# Allegro board 980K2-260817_261115-1_RoutingTask.brd
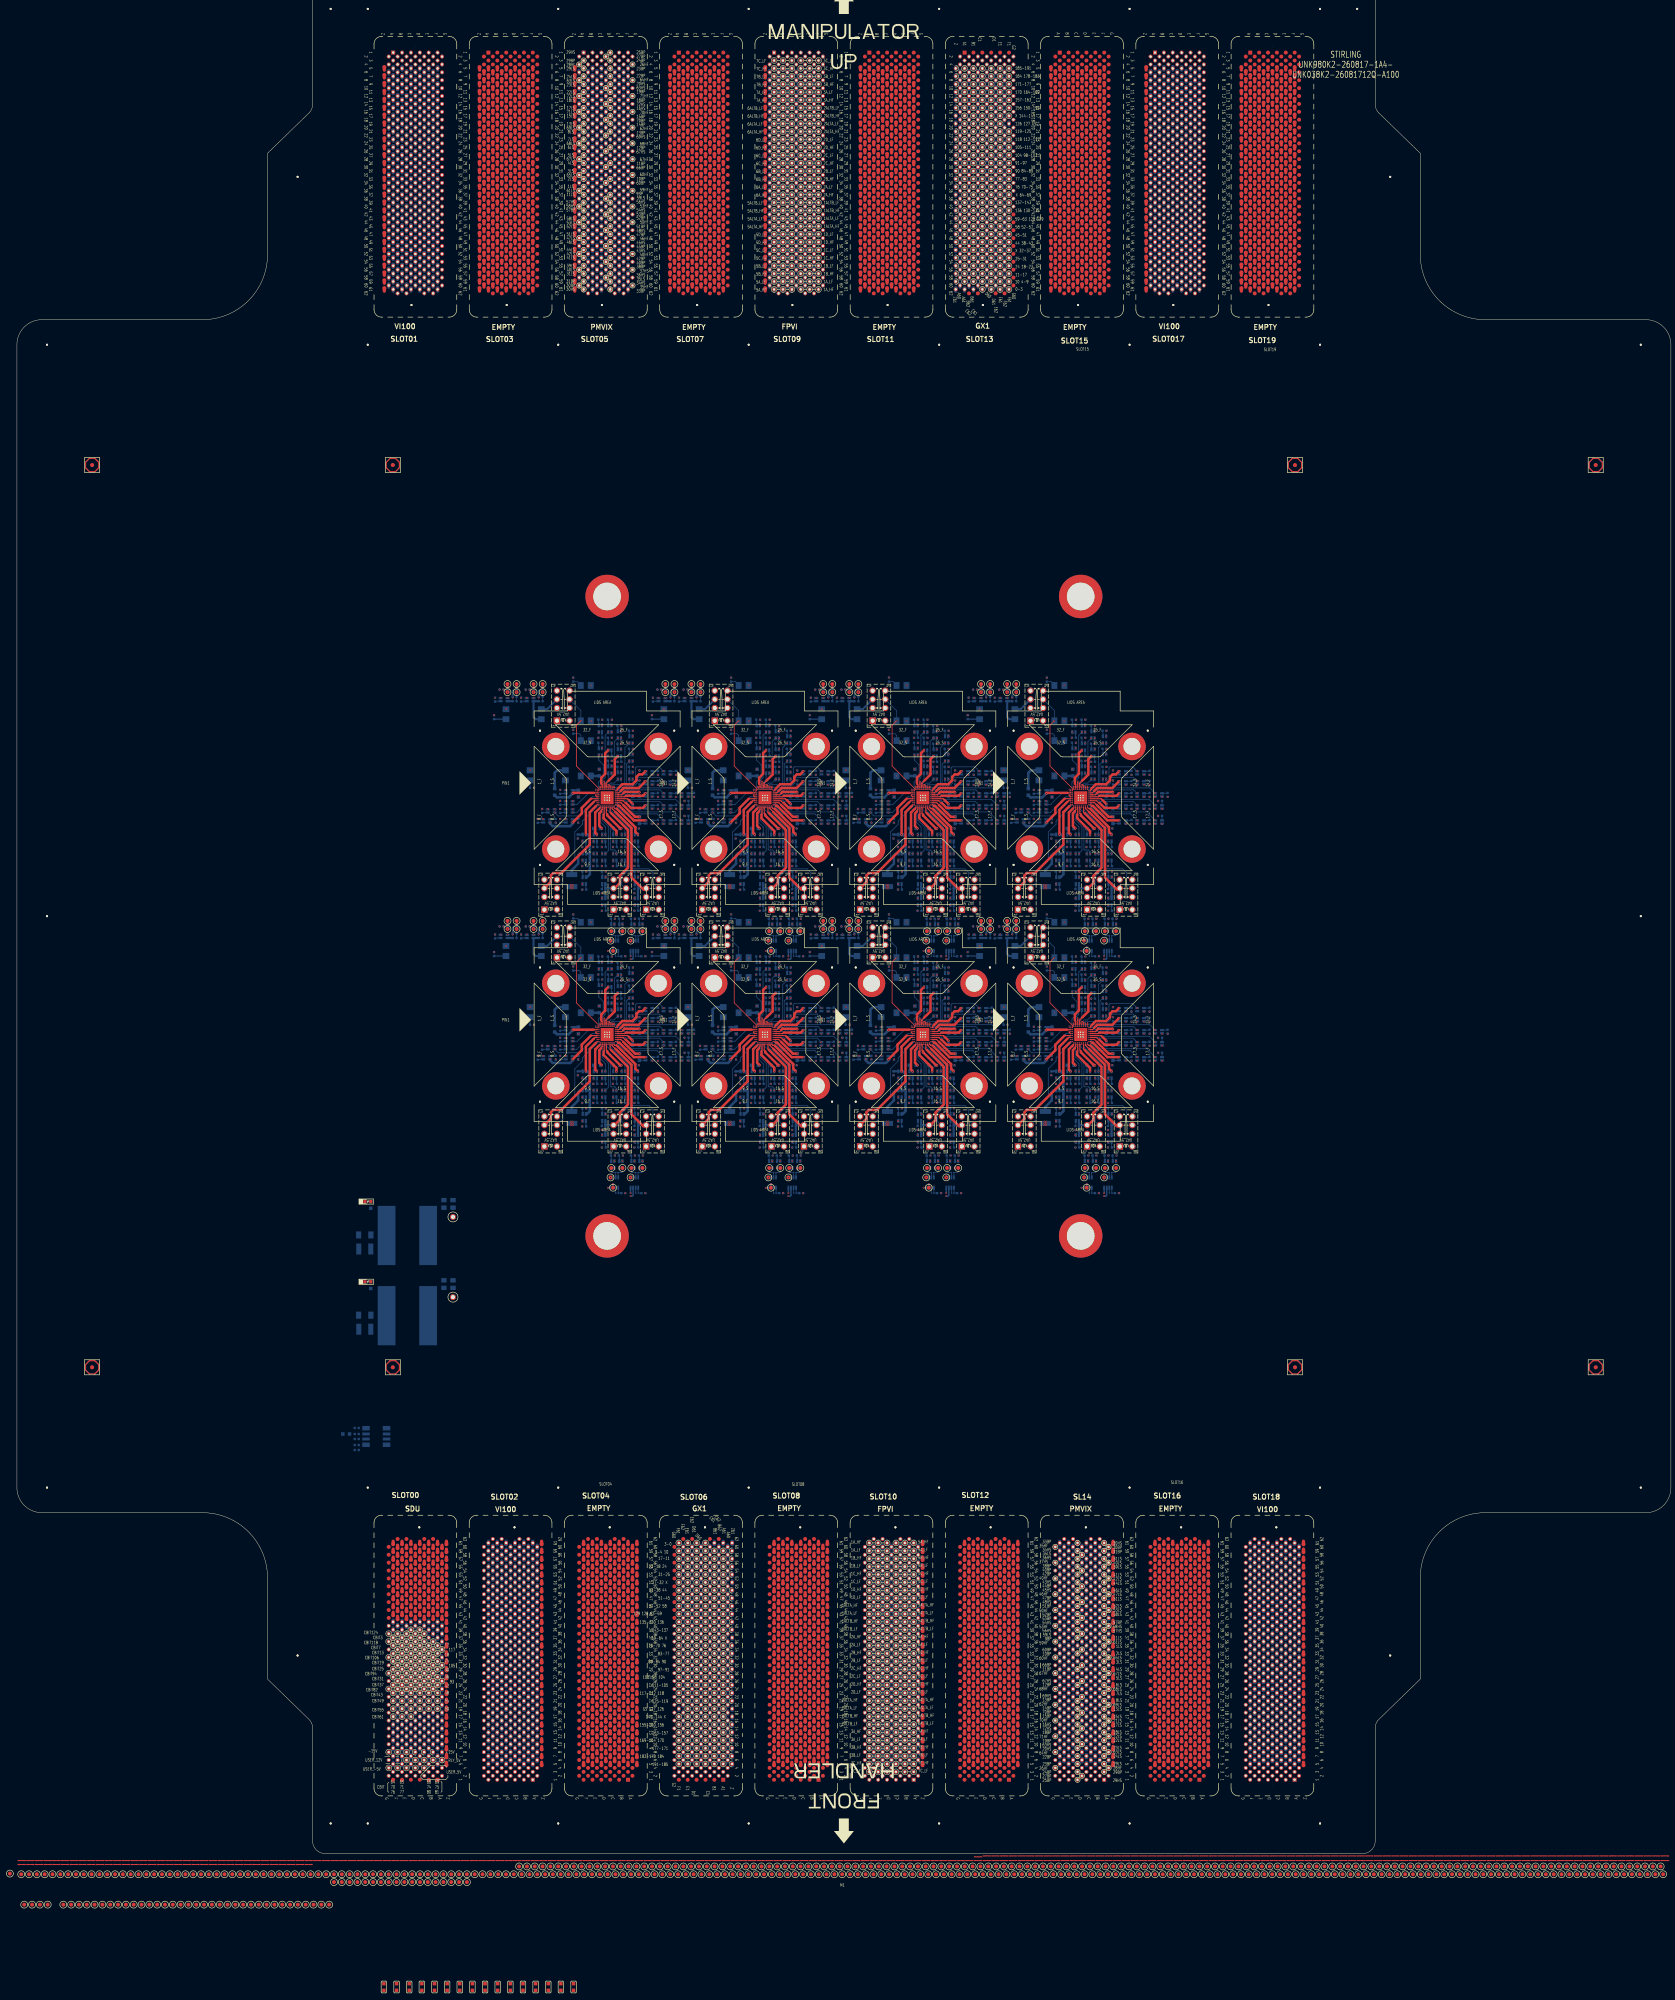
[diagram p0: board, top side]
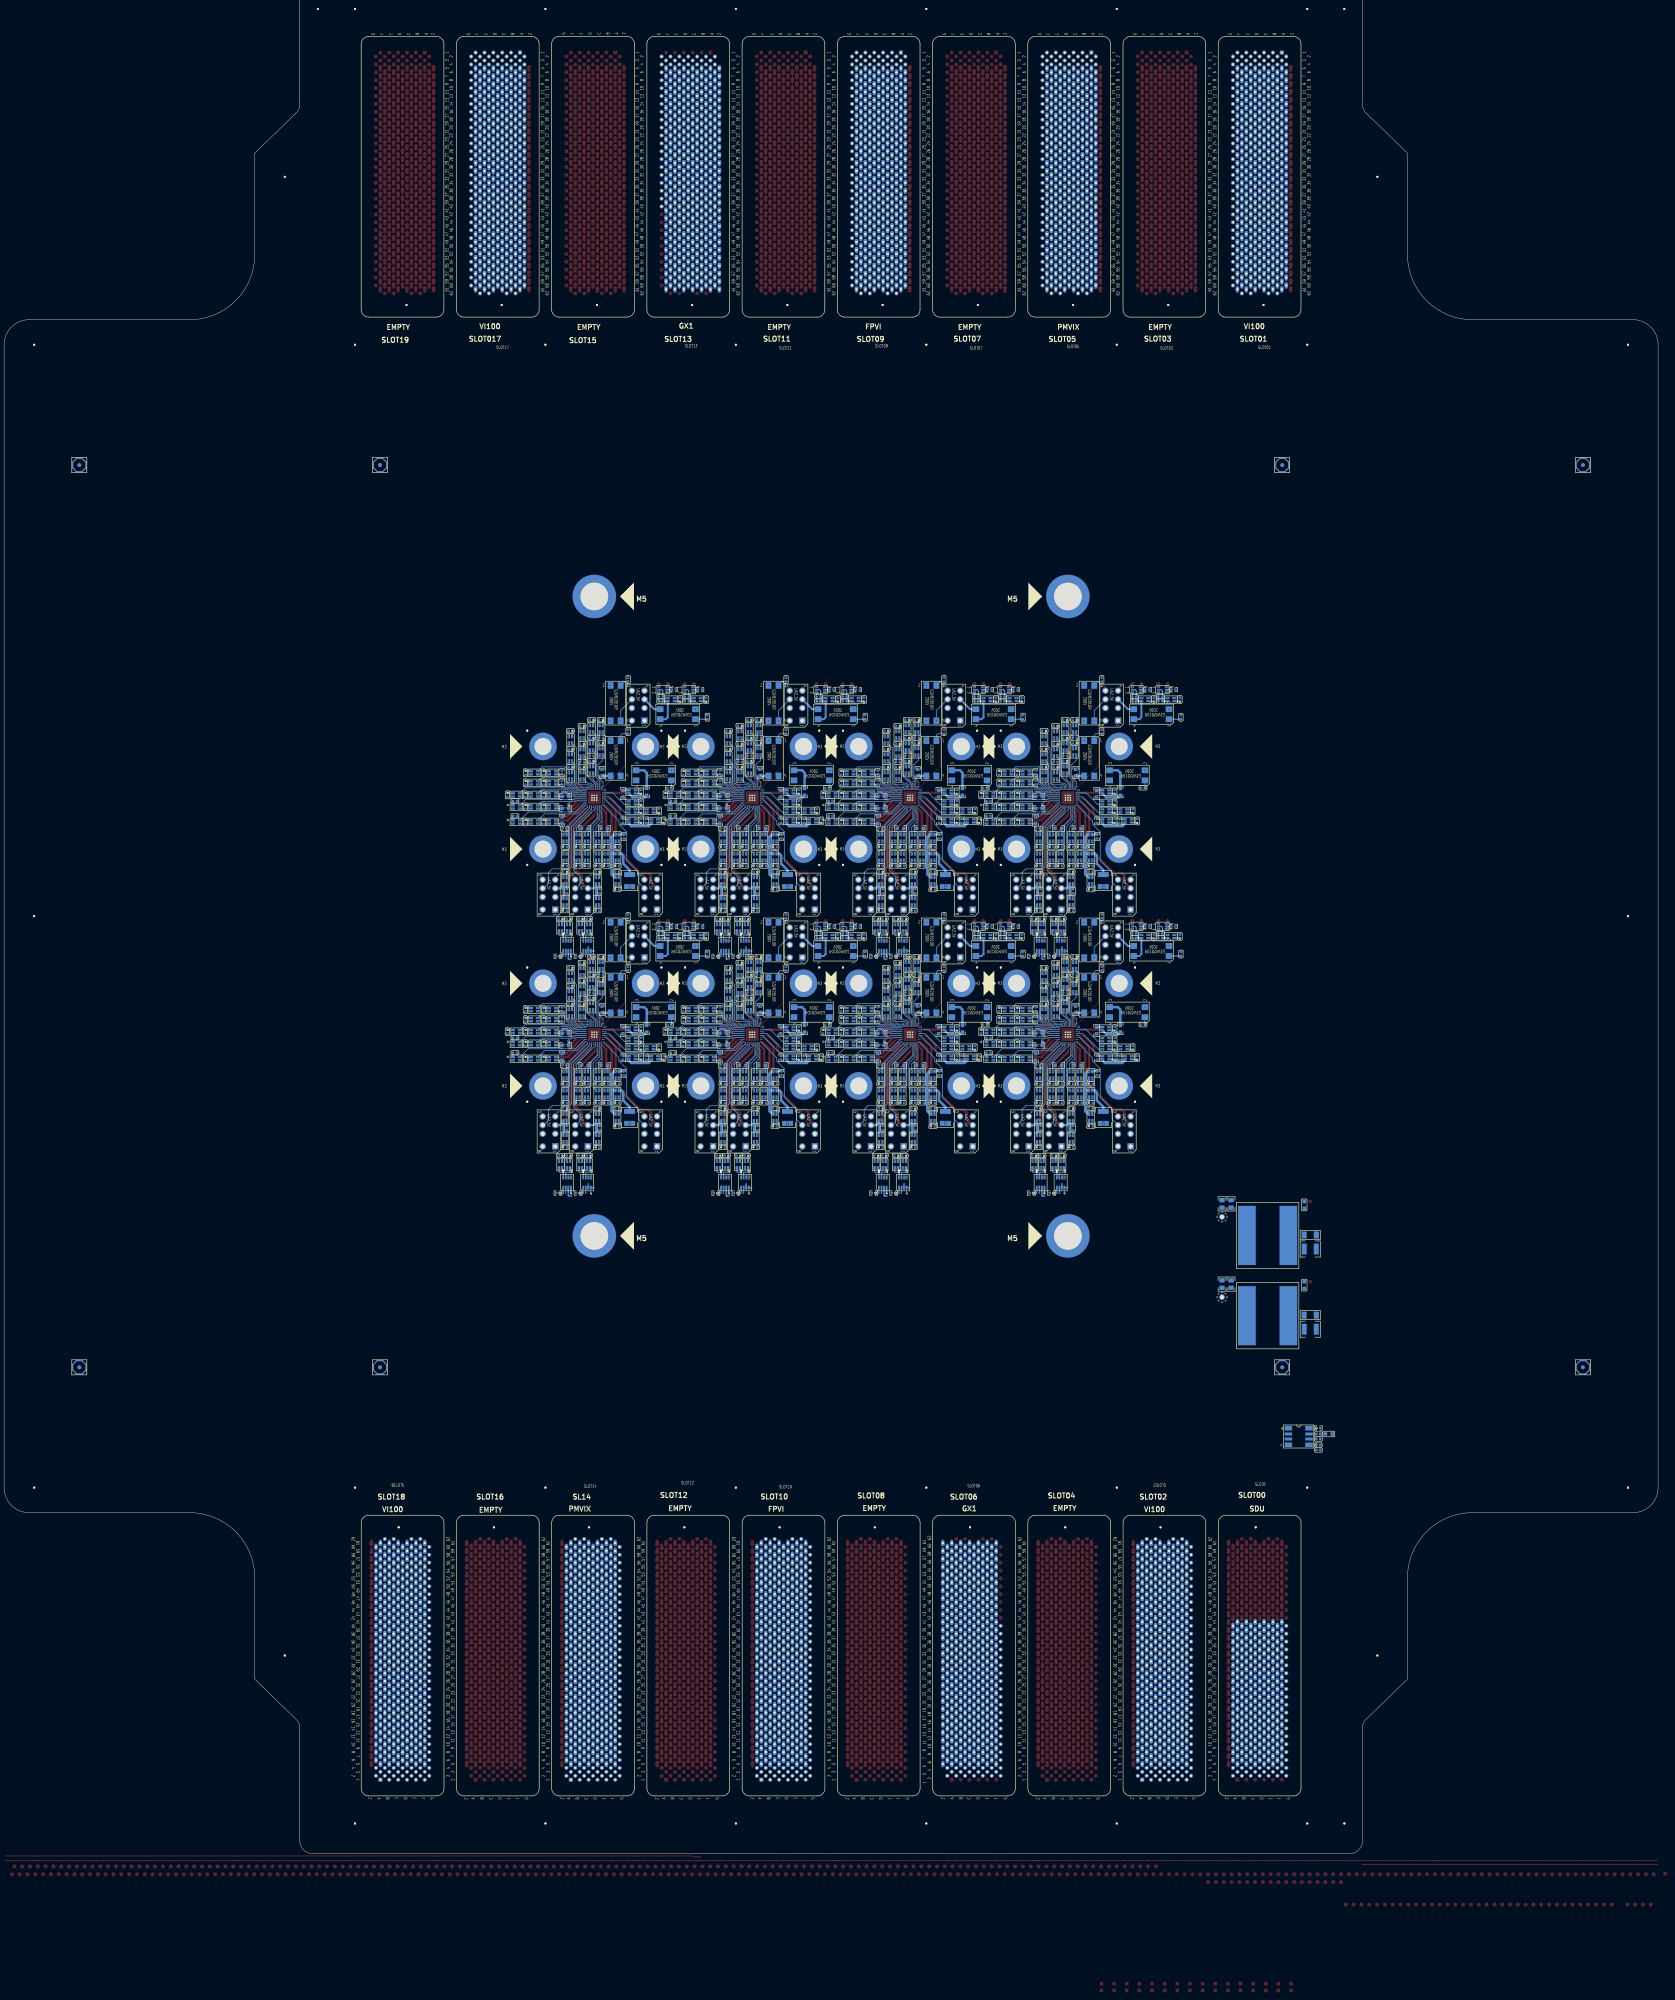
[diagram p1: board, bottom side, seen from below]

Outline 419.1 x 474.98 mm; copper layers: TOP, L02_GND, L03_DP, L04_GND, L05_DP, L06_GND, L07_VI, L08_GND, L09_VI, L10_GND, L11_VI, L12_GND, L13_VI, L14_GND, L15_5V, L16_5V, L17_C-BIT, L18_C-BIT, L19_GND, L20_VI, L21_GND, L22_VI, L23_GND, L24_VI, L25_GND, L26_VI, L27_GND, L28_DP, L29_GND, L30_DP, L31_GND, BOTTOM. Coordinates in mm from the lower left corner of the outline.

## Placement (name value [footprint] x y rotation side)
BC9  0.1U-50-X-S4-TDK  [C0402]  86.11 107.82 180 bottom
BR5  1K-1-S4  [R0402]  86.11 106.3 0 bottom
BR6  1K-1-S4  [R0402]  86.11 103.5 0 bottom
BR7  0-5-S6  [R0603]  83.44 106.3 180 bottom
BR8  0-5-S4  [R0402]  86.11 105.03 180 bottom
BR9  0-5-S4  [R0402]  86.11 102.24 180 bottom
BU1  AT24C512C-SSHM-T-SOIC8  [SO8_206X127MM]  91.06 105.66 180 bottom
C48  0.01U-100-X7R-S6-MU  [C0603]  147.57 273.87 90 bottom
C49  0.01U-100-X7R-S6-MU  [C0603]  136.27 268.99 270 bottom
C50  0.01U-100-X7R-S6-MU  [C0603]  142.28 268.54 270 bottom
C53  1U-16-X5R-S4-YA  [C0402]  142.24 261.62 270 bottom
C54  2.2U-16-X-S4-MU  [C0402]  136.53 261.62 270 bottom
C58  1U-16-X5R-S4-YA  [C0402]  142.11 257.68 270 bottom
C59  4.7U-100-X-SB-MU  [C1210]  140.59 246.51 270 bottom
C60  0.01U-100-X7R-S6-MU  [C0603]  147.01 259.72 0 bottom
C61  0.01U-100-X7R-S6-MU  [C0603]  156.88 264.78 180 bottom
C62  2.2U-16-X-S4-MU  [C0402]  157.07 259.72 0 bottom
C63  0.01U-100-X7R-S6-MU  [C0603]  157.73 261.82 90 bottom
C64  0.01U-100-X7R-S6-MU  [C0603]  156.88 267.82 180 bottom
C65  0.1U-25-X7R-S4-MU  [C0402]  157.73 271.37 90 bottom
C66  0.1U-25-X7R-S4-MU  [C0402]  152.65 276.61 180 bottom
C67  0.1U-25-X7R-S4-MU  [C0402]  150.24 278.13 180 bottom
C68  0.1U-25-X7R-S4-MU  [C0402]  147.83 282.7 180 bottom
C69  0.01U-100-X7R-S6-MU  [C0603]  151.96 259.72 0 bottom
C70  0.1U-25-X7R-S4-MU  [C0402]  122.8 294.89 180 bottom
C71  0.1U-25-X7R-S4-MU  [C0402]  129.42 294.89 180 bottom
C72  0.1U-25-X7R-S4-MU  [C0402]  158.75 227.33 0 bottom
C73  0.1U-25-X7R-S4-MU  [C0402]  153.67 227.33 0 bottom
C74  0.1U-25-X7R-S4-MU  [C0402]  157.73 273.91 90 bottom
CT1  47U-16-X5R-SB-MU  [C1210]  88.14 153.16 180 bottom
CT2  10U-16-X5R-S8-TY  [C0805]  108.2 164.59 90 bottom
CT3  22U-16-X-S8-MU  [C0805]  110.49 164.59 90 bottom
CT7  47U-16-X5R-SB-MU  [C1210]  88.14 132.84 180 bottom
CT8  10U-16-X5R-S8-TY  [C0805]  110.49 144.27 90 bottom
CT9  22U-16-X-S8-MU  [C0805]  108.2 144.27 90 bottom
F1  C1F8-0.25A-SA  [FUSE_1206_H1P05MM]  88.14 156.72 0 bottom
F2  C1F8-0.25A-SA  [FUSE_1206_H1P05MM]  88.14 136.4 0 bottom
FD1  -  [FD_040_V2]  95.25 123.19 0 top
FD2  -  [FD_040_V2]  323.85 123.19 0 top
FD3  -  [FD_040_V2]  323.85 351.79 0 top
FD4  -  [FD_040_V2]  95.25 351.79 0 top
FD5  -  [FD_040_V2]  323.85 123.19 180 bottom
FD6  -  [FD_040_V2]  95.25 123.19 180 bottom
FD7  -  [FD_040_V2]  95.25 351.79 180 bottom
FD8  -  [FD_040_V2]  323.85 351.79 180 bottom
FD9  -  [FD_040_V2]  19.05 123.19 0 top
FD10  -  [FD_040_V2]  400.05 123.19 0 top
FD11  -  [FD_040_V2]  400.05 351.79 0 top
FD12  -  [FD_040_V2]  19.05 351.79 0 top
FD13  -  [FD_040_V2]  400.05 123.19 180 bottom
FD14  -  [FD_040_V2]  19.05 123.19 180 bottom
FD15  -  [FD_040_V2]  19.05 351.79 180 bottom
FD16  -  [FD_040_V2]  400.05 351.79 180 bottom
K1  UA2-5NJ-A-V3  [RL_NECUA2_5V_V3]  138.43 290.63 270 bottom
K2  G3VM-201DR  [RL_G3VM201DR_200V]  144.15 277.5 0 bottom
K3  G3VM-201DR  [RL_G3VM201DR_200V]  134.49 273.18 90 bottom
K4  G3VM-201DR  [RL_G3VM201DR_200V]  144.15 291.47 0 bottom
K5  G3VM-51UR-5V-VSON4  [RL_G3VM_4P_VSON4]  139.95 268.99 0 bottom
K6  G3VM-51UR-5V-VSON4  [RL_G3VM_4P_VSON4]  139.95 266.19 0 bottom
K7  G3VM-51UR-5V-VSON4  [RL_G3VM_4P_VSON4]  139.95 264.16 0 bottom
K8  G3VM-51UR-5V-VSON4  [RL_G3VM_4P_VSON4]  139.95 261.62 0 bottom
K9  G3VM-51UR-5V-VSON4  [RL_G3VM_4P_VSON4]  134.24 261.62 0 bottom
K10  G3VM-51UR-5V-VSON4  [RL_G3VM_4P_VSON4]  135.38 264.16 0 bottom
K11  G3VM-51UR-5V-VSON4  [RL_G3VM_4P_VSON4]  143.76 257.3 90 bottom
K12  G3VM-51UR-5V-VSON4  [RL_G3VM_4P_VSON4]  143.76 252.48 90 bottom
K13  G3VM-51UR-5V-VSON4  [RL_G3VM_4P_VSON4]  143.76 246.51 90 bottom
K14  G3VM-51UR-5V-VSON4  [RL_G3VM_4P_VSON4]  146.56 252.48 90 bottom
K15  UA2-5NJ-A-V3  [RL_NECUA2_5V_V3]  135.25 242.75 270 bottom
K16  G3VM-51UR-5V-VSON4  [RL_G3VM_4P_VSON4]  146.56 257.3 90 bottom
K17  G3VM-51UR-5V-VSON4  [RL_G3VM_4P_VSON4]  148.72 257.3 90 bottom
K18  G3VM-51UR-5V-VSON4  [RL_G3VM_4P_VSON4]  148.72 252.48 90 bottom
K19  G3VM-51UR-5V-VSON4  [RL_G3VM_4P_VSON4]  151.51 257.3 90 bottom
K20  G3VM-51UR-5V-VSON4  [RL_G3VM_4P_VSON4]  151.51 252.48 90 bottom
K21  G3VM-51UR-5V-VSON4  [RL_G3VM_4P_VSON4]  153.67 257.3 90 bottom
K22  G3VM-51UR-5V-VSON4  [RL_G3VM_4P_VSON4]  153.67 252.48 90 bottom
K23  UA2-5NJ-A-V3  [RL_NECUA2_5V_V3]  152.78 242.75 270 bottom
K24  UA2-5NJ-A-V3  [RL_NECUA2_5V_V3]  161.04 242.75 270 bottom
K25  G3VM-51UR-5V-VSON4  [RL_G3VM_4P_VSON4]  156.97 257.3 90 bottom
K26  G3VM-51UR-5V-VSON4  [RL_G3VM_4P_VSON4]  156.97 252.48 90 bottom
K27  G3VM-51UR-5V-VSON4  [RL_G3VM_4P_VSON4]  160.15 261.37 180 bottom
K28  G3VM-51UR-5V-VSON4  [RL_G3VM_4P_VSON4]  164.72 261.37 180 bottom
K29  G3VM-51UR-5V-VSON4  [RL_G3VM_4P_VSON4]  169.29 261.37 180 bottom
K30  G3VM-51UR-5V-VSON4  [RL_G3VM_4P_VSON4]  160.15 265.18 180 bottom
K31  G3VM-51UR-5V-VSON4  [RL_G3VM_4P_VSON4]  164.72 265.18 180 bottom
K32  G3VM-51UR-5V-VSON4  [RL_G3VM_4P_VSON4]  169.29 265.18 180 bottom
K33  G3VM-51UR-5V-VSON4  [RL_G3VM_4P_VSON4]  160.15 268.22 180 bottom
K34  G3VM-51UR-5V-VSON4  [RL_G3VM_4P_VSON4]  164.72 268.22 180 bottom
K35  G3VM-51UR-5V-VSON4  [RL_G3VM_4P_VSON4]  169.29 268.22 180 bottom
K36  G3VM-51UR-5V-VSON4  [RL_G3VM_4P_VSON4]  160.15 271.27 180 bottom
K37  G3VM-51UR-5V-VSON4  [RL_G3VM_4P_VSON4]  164.72 271.27 180 bottom
K38  G3VM-51UR-5V-VSON4  [RL_G3VM_4P_VSON4]  160.15 273.81 180 bottom
K39  G3VM-51UR-5V-VSON4  [RL_G3VM_4P_VSON4]  164.72 273.81 180 bottom
K40  G3VM-51UR-5V-VSON4  [RL_G3VM_4P_VSON4]  155.58 273.05 270 bottom
K41  G3VM-51UR-5V-VSON4  [RL_G3VM_4P_VSON4]  155.58 277.62 270 bottom
K42  G3VM-51UR-5V-VSON4  [RL_G3VM_4P_VSON4]  155.58 282.19 270 bottom
K43  G3VM-51UR-5V-VSON4  [RL_G3VM_4P_VSON4]  152.65 273.05 270 bottom
K44  G3VM-51UR-5V-VSON4  [RL_G3VM_4P_VSON4]  152.65 278.89 270 bottom
K45  G3VM-51UR-5V-VSON4  [RL_G3VM_4P_VSON4]  152.65 283.46 270 bottom
K46  G3VM-51UR-5V-VSON4  [RL_G3VM_4P_VSON4]  150.24 274.57 270 bottom
K47  G3VM-51UR-5V-VSON4  [RL_G3VM_4P_VSON4]  150.24 280.42 270 bottom
K48  G3VM-51UR-5V-VSON4  [RL_G3VM_4P_VSON4]  150.24 284.99 270 bottom
K49  G3VM-51UR-5V-VSON4  [RL_G3VM_4P_VSON4]  147.83 284.99 270 bottom
K50  G3VM-51UR-5V-VSON4  [RL_G3VM_4P_VSON4]  147.83 279.15 270 bottom
K51  G3VM-51UR-5V-VSON4  [RL_G3VM_4P_VSON4]  148.72 246.51 270 bottom
K52  G3VM-51UR-5V-VSON4  [RL_G3VM_4P_VSON4]  148.72 241.17 90 bottom
K53  G3VM-51UR-5V-VSON4  [RL_G3VM_4P_VSON4]  156.97 246.51 270 bottom
K54  G3VM-51UR-5V-VSON4  [RL_G3VM_4P_VSON4]  156.97 241.17 90 bottom
K55  G3VM-51UR-5V-VSON4  [RL_G3VM_4P_VSON4]  123.44 292.35 0 bottom
K56  G3VM-201DR  [RL_G3VM201DR_200V]  128.4 288.67 90 bottom
K57  G3VM-51UR-5V-VSON4  [RL_G3VM_4P_VSON4]  158.12 234.57 270 bottom
K58  G3VM-51UR-5V-VSON4  [RL_G3VM_4P_VSON4]  156.08 234.57 270 bottom
K59  G3VM-51UR-5V-VSON4  [RL_G3VM_4P_VSON4]  153.04 234.57 270 bottom
K60  G3VM-51UR-5V-VSON4  [RL_G3VM_4P_VSON4]  151 234.57 270 bottom
K61  G3VM-51UR-5V-VSON4  [RL_G3VM_4P_VSON4]  130.05 292.35 0 bottom
LD1  LDG-2-S6  [LED_0603]  88.91 165.19 0 top
LD3  LDG-2-S6  [LED_0603]  88.91 144.87 0 top
LT1  L10U-16A-S16.5X15.5-PU  [IND_16P5X15P5MM]  98.93 156.59 0 bottom
LT3  L10U-16A-S16.5X15.5-PU  [IND_16P5X15P5MM]  98.93 136.27 0 bottom
M1  PG_LTXDX_F_X1_OUTLINE_TD_V2  [PG_LTXDX_F_X1_OUTLINE_TD_COHU]  209.55 237.49 0 top
NOREF  -  []  268.32 245.63 90 top
NOREF#2  -  []  193.6 226.96 0 top
NOREF#3  -  []  270.6 173.69 0 top
NOREF#4  -  []  156.7 193.03 90 top
NOREF#5  -  []  141.55 207.14 90 top
NOREF#6  -  []  185.41 286.99 90 top
NOREF#7  -  []  279.65 272.56 0 top
NOREF#8  -  []  233.18 244.35 0 top
NOREF#9  -  []  268.32 245.63 0 top
NOREF#10  -  []  147.8 204.99 90 top
NOREF#11  -  []  178.85 241.15 90 top
NOREF#12  -  []  235.17 221.32 0 top
NOREF#13  -  []  290.89 209.17 0 top
NOREF#14  -  []  192.25 222.59 90 top
NOREF#15  -  []  232.63 173.69 0 top
NOREF#16  -  []  214.43 232.23 0 top
NOREF#17  -  []  164.95 212.86 90 top
NOREF#18  -  []  231.11 200.17 90 top
NOREF#19  -  []  226.01 190.88 90 top
NOREF#20  -  []  144.16 191.6 90 top
NOREF#21  -  []  274.33 267.37 90 top
NOREF#22  -  []  225.61 197.6 0 top
NOREF#23  -  []  192.13 280.09 0 top
NOREF#24  -  []  243.97 200.64 90 top
NOREF#25  -  []  279.4 205.9 0 top
NOREF#26  -  []  204.95 212.86 90 top
NOREF#27  -  []  242.26 236.17 90 top
NOREF#28  -  []  163.84 205.58 0 top
NOREF#29  -  []  178.95 266.12 0 top
NOREF#30  -  []  266.01 250.88 90 top
NOREF#31  -  []  235.17 212.18 0 top
NOREF#32  -  []  142.81 247.68 0 top
NOREF#33  -  []  133.64 239.09 0 top
NOREF#34  -  []  256.63 292.23 0 top
NOREF#35  -  []  156.1 211.85 90 top
NOREF#36  -  []  170.89 269.17 0 top
NOREF#37  -  []  187.43 284.11 90 top
NOREF#38  -  []  279.4 270.55 90 top
NOREF#39  -  []  243.97 273.09 90 top
NOREF#40  -  []  273.94 196.75 0 top
NOREF#41  -  []  157.04 184.35 0 top
NOREF#42  -  []  197.71 173.69 0 top
NOREF#43  -  []  229.12 240.3 90 top
NOREF#44  -  []  217.29 187.78 0 top
NOREF#45  -  []  211.14 458.49 0 top
NOREF#46  -  []  193.56 173.37 90 top
NOREF#47  -  []  148.95 266.89 0 top
NOREF#48  -  []  204.95 267.27 90 top
NOREF#49  -  []  213.78 267.01 0 top
NOREF#50  -  []  131.26 244.35 0 top
NOREF#51  -  []  239.4 265.9 0 top
NOREF#52  -  []  202.85 297.22 0 top
NOREF#53  -  []  204.95 207.27 90 top
NOREF#54  -  []  237.04 244.35 0 top
NOREF#55  -  []  179.72 213.6 90 top
NOREF#56  -  []  228.44 181.72 90 top
NOREF#57  -  []  164.95 267.27 90 top
NOREF#58  -  []  187.3 280.35 0 top
NOREF#59  -  []  159.27 213.41 90 top
NOREF#60  -  []  284.95 270.32 90 top
NOREF#61  -  []  180.83 261.22 90 top
NOREF#62  -  []  229.84 219.54 0 top
NOREF#63  -  []  281.12 188.11 90 top
NOREF#64  -  []  217.25 236.5 90 top
NOREF#65  -  []  245.38 226.23 0 top
NOREF#66  -  []  173.64 299.09 0 top
NOREF#67  -  []  266.43 296.46 90 top
NOREF#68  -  []  243.97 213.09 90 top
NOREF#69  -  []  148.44 197.85 90 top
NOREF#70  -  []  272.63 173.69 90 top
NOREF#71  -  []  228.44 197.85 90 top
NOREF#72  -  []  101.95 82.65 0 top
NOREF#73  -  []  153.39 257.85 90 top
NOREF#74  -  []  122.57 291.95 0 top
NOREF#75  -  []  180.83 208.59 90 top
NOREF#76  -  []  192.63 173.69 90 top
NOREF#77  -  []  236.02 241.47 0 top
NOREF#78  -  []  273.76 255.7 90 top
NOREF#79  -  []  142.88 273.02 0 top
NOREF#80  -  []  283.04 176.5 90 top
NOREF#81  -  []  178.95 264.09 0 top
NOREF#82  -  []  164.61 234.24 90 top
NOREF#83  -  []  230.97 255.7 90 top
NOREF#84  -  []  221.85 292.49 0 top
NOREF#85  -  []  204.32 231.95 90 top
NOREF#86  -  []  190.97 239.57 90 top
NOREF#87  -  []  136.5 285.91 90 top
NOREF#88  -  []  187.05 209.24 0 top
NOREF#89  -  []  135.15 263.21 0 top
NOREF#90  -  []  137.28 286.47 90 top
NOREF#91  -  []  276.61 173.37 90 top
NOREF#92  -  []  221.85 232.5 0 top
NOREF#93  -  []  187 83.81 0 top
NOREF#94  -  []  155.68 233.69 90 top
NOREF#95  -  []  239.72 223.79 90 top
NOREF#96  -  []  125.25 291.4 0 top
NOREF#97  -  []  242.85 237.22 0 top
NOREF#98  -  []  283.97 204.45 90 top
NOREF#99  -  []  282.26 236.17 90 top
NOREF#100  -  []  149.24 245.31 90 top
NOREF#101  -  []  268.99 256.75 0 top
NOREF#102  -  []  235.56 175.77 0 top
NOREF#103  -  []  232.63 233.69 0 top
NOREF#104  -  []  279.27 214.21 0 top
NOREF#105  -  []  223.36 247.38 0 top
NOREF#106  -  []  163.97 274.54 0 top
NOREF#107  -  []  148.78 184.35 0 top
NOREF#108  -  []  239.27 264.78 90 top
NOREF#109  -  []  228.35 217.95 90 top
NOREF#110  -  []  161.44 244.35 0 top
NOREF#111  -  []  270.6 173.69 90 top
NOREF#112  -  []  231.11 193.35 0 top
NOREF#113  -  []  100.95 17.15 0 top
NOREF#114  -  []  231.98 280.75 90 top
NOREF#115  -  []  231.19 283.92 0 top
NOREF#116  -  []  233.56 233.37 90 top
NOREF#117  -  []  279.27 264.78 90 top
NOREF#118  -  []  237.37 256.43 90 top
NOREF#119  -  []  154.63 279.22 90 top
NOREF#120  -  []  175.11 201.22 90 top
NOREF#121  -  []  197.25 240.62 0 top
NOREF#122  -  []  286.32 266.13 0 top
NOREF#123  -  []  211.21 234.24 90 top
NOREF#124  -  []  215.59 16.49 0 top
NOREF#125  -  []  232.63 233.69 90 top
NOREF#126  -  []  230.41 228.7 90 top
NOREF#127  -  []  163.97 213.09 90 top
NOREF#128  -  []  199.27 214.21 0 top
NOREF#129  -  []  239.06 178.07 0 top
NOREF#130  -  []  196.61 233.37 90 top
NOREF#131  -  []  180.95 201.55 90 top
NOREF#132  -  []  248.42 208.62 0 top
NOREF#133  -  []  243.97 260.64 90 top
NOREF#134  -  []  143.89 185.24 90 top
NOREF#135  -  []  162.2 238.35 0 top
NOREF#136  -  []  204.61 294.89 90 top
NOREF#137  -  []  273.6 216.55 0 top
NOREF#138  -  []  146.43 236.47 90 top
NOREF#139  -  []  223.89 245.24 90 top
NOREF#140  -  []  259.08 265.79 0 top
NOREF#141  -  []  135.15 268.04 0 top
NOREF#142  -  []  267.43 278.27 0 top
NOREF#143  -  []  202.44 292.28 0 top
NOREF#144  -  []  242.2 178.35 0 top
NOREF#145  -  []  159.27 201.77 0 top
NOREF#146  -  []  174.51 203.76 0 top
NOREF#147  -  []  229.84 213.7 0 top
NOREF#148  -  []  276.57 242.05 0 top
NOREF#149  -  []  266.69 223.05 90 top
NOREF#150  -  []  254 14.59 90 top
NOREF#151  -  []  268.81 190.88 90 top
NOREF#152  -  []  148.99 251.93 0 top
NOREF#153  -  []  141.85 232.5 0 top
NOREF#154  -  []  188.44 257.85 90 top
NOREF#155  -  []  235.68 173.69 0 top
NOREF#156  -  []  196.7 253.03 90 top
NOREF#157  -  []  269.12 191.6 90 top
NOREF#158  -  []  154.63 277.85 0 top
NOREF#159  -  []  192.25 272.17 0 top
NOREF#160  -  []  276.84 227.33 0 top
NOREF#161  -  []  191.91 251.6 90 top
NOREF#162  -  []  209.52 260.42 90 top
NOREF#163  -  []  255.65 184.35 0 top
NOREF#164  -  []  269.24 245.31 90 top
NOREF#165  -  []  156.02 248.11 90 top
NOREF#166  -  []  288.42 204.78 90 top
NOREF#167  -  []  168.54 262.09 0 top
NOREF#168  -  []  137.28 286.47 0 top
NOREF#169  -  []  148.32 198.18 0 top
NOREF#170  -  []  78.11 0 90 top
NOREF#171  -  []  157.71 232.86 0 top
NOREF#172  -  []  267.9 205.84 90 top
NOREF#173  -  []  199.4 272 0 top
NOREF#174  -  []  275.51 454.29 90 top
NOREF#175  -  []  203.84 260.97 90 top
NOREF#176  -  []  143.36 253.35 0 top
NOREF#177  -  []  166.32 202.32 0 top
NOREF#178  -  []  152.25 212.18 90 top
NOREF#179  -  []  187.01 458.49 0 top
NOREF#180  -  []  146.83 256.75 0 top
NOREF#181  -  []  232.13 214.25 0 top
NOREF#182  -  []  223.36 253.35 0 top
NOREF#183  -  []  215.11 201.22 90 top
NOREF#184  -  []  241.41 167.9 90 top
NOREF#185  -  []  260.83 205.79 90 top
NOREF#186  -  []  288.42 267.82 90 top
NOREF#187  -  []  152.25 218.02 90 top
NOREF#188  -  []  184.04 196.75 0 top
NOREF#189  -  []  139.73 178.35 0 top
NOREF#190  -  []  221.55 209.94 90 top
NOREF#191  -  []  180.83 205.79 90 top
NOREF#192  -  []  164.04 237.5 90 top
NOREF#193  -  []  272.25 278.02 0 top
NOREF#194  -  []  185.41 226.99 90 top
NOREF#195  -  []  283.97 268.95 0 top
NOREF#196  -  []  153.39 253.03 90 top
NOREF#197  -  []  192.63 233.69 90 top
NOREF#198  -  []  219.73 238.35 0 top
NOREF#199  -  []  213.24 261.55 0 top
NOREF#200  -  []  262.87 273.02 0 top
NOREF#201  -  []  147.77 247.68 0 top
NOREF#202  -  []  199.22 195.7 90 top
NOREF#203  -  []  209.52 270.32 90 top
NOREF#204  -  []  138.35 204.47 0 top
NOREF#205  -  []  159.24 244.35 0 top
NOREF#206  -  []  193.03 232.1 0 top
NOREF#207  -  []  262.87 286.99 0 top
NOREF#208  -  []  150.41 228.7 90 top
NOREF#209  -  []  284.95 212.86 90 top
NOREF#210  -  []  193.76 250.88 90 top
NOREF#211  -  []  175.11 261.22 90 top
NOREF#212  -  []  95.33 18.69 0 top
NOREF#213  -  []  236.84 167.33 0 top
NOREF#214  -  []  266.16 200.17 90 top
NOREF#215  -  []  177.29 247.78 0 top
NOREF#216  -  []  89.76 164.74 90 top
NOREF#217  -  []  189.72 221.62 0 top
NOREF#218  -  []  209.55 237.49 0 top
NOREF#219  -  []  226.16 253.35 0 top
NOREF#220  -  []  220.95 206.12 90 top
NOREF#221  -  []  259.08 203.76 0 top
NOREF#222  -  []  88.14 155.19 0 top
NOREF#223  -  []  166.32 274.76 0 top
NOREF#224  -  []  140.59 244.98 90 top
NOREF#225  -  []  294.09 260.42 90 top
NOREF#226  -  []  238.11 232.1 0 top
NOREF#227  -  []  147.8 209.99 0 top
NOREF#228  -  []  233.94 251.93 0 top
NOREF#229  -  []  235.58 202.67 90 top
NOREF#230  -  []  199.27 265.58 0 top
NOREF#231  -  []  261.55 209.94 90 top
NOREF#232  -  []  182.87 226.99 0 top
NOREF#233  -  []  179.08 208.59 0 top
NOREF#234  -  []  254.43 232.23 0 top
NOREF#235  -  []  233.18 222.26 90 top
NOREF#236  -  []  271.53 233.37 90 top
NOREF#237  -  []  148.19 187.71 0 top
NOREF#238  -  []  209.52 264.23 90 top
NOREF#239  -  []  272.25 282.59 0 top
NOREF#240  -  []  273.27 258.18 0 top
NOREF#241  -  []  243.97 267.5 90 top
NOREF#242  -  []  218.83 232.23 0 top
NOREF#243  -  []  270.97 179.57 90 top
NOREF#244  -  []  119.46 18.69 90 top
NOREF#245  -  []  122.2 178.35 0 top
NOREF#246  -  []  229.72 221.62 0 top
NOREF#247  -  []  283.97 205.9 0 top
NOREF#248  -  []  281.41 227.9 90 top
NOREF#249  -  []  188.81 195.7 90 top
NOREF#250  -  []  215.65 184.35 0 top
NOREF#251  -  []  274.07 191.6 90 top
NOREF#252  -  []  211.21 294.89 90 top
NOREF#253  -  []  243.84 208.62 0 top
NOREF#254  -  []  140.83 203.76 90 top
NOREF#255  -  []  122.85 281.02 0 top
NOREF#256  -  []  197.25 180.62 0 top
NOREF#257  -  []  249.05 292.28 0 top
NOREF#258  -  []  203.84 204.78 90 top
NOREF#259  -  []  233.39 257.85 90 top
NOREF#260  -  []  192.25 278.02 90 top
NOREF#261  -  []  199.27 267.82 90 top
NOREF#262  -  []  149.67 252.5 90 top
NOREF#263  -  []  191.87 456.29 90 top
NOREF#264  -  []  199.27 205.58 0 top
NOREF#265  -  []  270.15 266.89 90 top
NOREF#266  -  []  209.55 237.49 0 top
NOREF#267  -  []  276.1 280.99 90 top
NOREF#268  -  []  264.16 251.6 90 top
NOREF#269  -  []  203.84 210.87 90 top
NOREF#270  -  []  229.84 279.54 0 top
NOREF#271  -  []  152.66 226.35 90 top
NOREF#272  -  []  133.36 201.22 0 top
NOREF#273  -  []  214.09 264.23 90 top
NOREF#274  -  []  194.39 226.59 90 top
NOREF#275  -  []  89.74 155.92 90 top
NOREF#276  -  []  227.3 286.19 0 top
NOREF#277  -  []  239.27 267.82 90 top
NOREF#278  -  []  207.04 299.09 0 top
NOREF#279  -  []  143.36 258.18 0 top
NOREF#280  -  []  302.59 389.27 90 top
NOREF#281  -  []  267.43 224.11 90 top
NOREF#282  -  []  226.16 212.17 90 top
NOREF#283  -  []  228.78 244.35 0 top
NOREF#284  -  []  209.17 291.95 0 top
NOREF#285  -  []  208.42 264.78 90 top
NOREF#286  -  []  149.84 219.54 0 top
NOREF#287  -  []  138.75 457.2 0 top
NOREF#288  -  []  269.72 281.62 0 top
NOREF#289  -  []  164.95 272.86 90 top
NOREF#290  -  []  199.4 212 0 top
NOREF#291  -  []  283.84 260.97 90 top
NOREF#292  -  []  186.16 226.14 90 top
NOREF#293  -  []  199.72 279.22 90 top
NOREF#294  -  []  159.27 268.62 0 top
NOREF#295  -  []  159.4 268.95 0 top
NOREF#296  -  []  211.25 244.35 0 top
NOREF#297  -  []  163.84 267.82 90 top
NOREF#298  -  []  196.5 392.33 90 top
NOREF#299  -  []  151.24 257.85 90 top
NOREF#300  -  []  284.95 200.42 90 top
NOREF#301  -  []  188.32 253.35 0 top
NOREF#302  -  []  125.38 226.23 0 top
NOREF#303  -  []  254.09 200.42 90 top
NOREF#304  -  []  218.35 271.84 0 top
NOREF#305  -  []  165.49 452.29 90 top
NOREF#306  -  []  243.84 264.78 90 top
NOREF#307  -  []  267.8 269.99 0 top
NOREF#308  -  []  279.22 239.57 90 top
NOREF#309  -  []  236.7 197.85 90 top
NOREF#310  -  []  148.32 193.35 0 top
NOREF#311  -  []  254.33 389.27 90 top
NOREF#312  -  []  224.16 256.43 90 top
NOREF#313  -  []  148.81 195.7 90 top
NOREF#314  -  []  195.68 233.69 90 top
NOREF#315  -  []  260.83 203.76 90 top
NOREF#316  -  []  219.72 273.6 90 top
NOREF#317  -  []  154.63 282.42 0 top
NOREF#318  -  []  273.94 191.93 0 top
NOREF#319  -  []  146.7 223.05 90 top
NOREF#320  -  []  223.49 197.85 90 top
NOREF#321  -  []  149.55 248.99 90 top
NOREF#322  -  []  248.54 262.09 0 top
NOREF#323  -  []  228.35 223.79 90 top
NOREF#324  -  []  218.95 268.91 0 top
NOREF#325  -  []  203.84 200.97 90 top
NOREF#326  -  []  274.07 251.6 90 top
NOREF#327  -  []  187.43 224.11 0 top
NOREF#328  -  []  148.44 241.72 90 top
NOREF#329  -  []  188.32 193.35 0 top
NOREF#330  -  []  254.09 204.23 90 top
NOREF#331  -  []  239.27 201.77 0 top
NOREF#332  -  []  194.39 286.59 90 top
NOREF#333  -  []  203.97 260.64 90 top
NOREF#334  -  []  302.26 14.59 90 top
NOREF#335  -  []  276.52 225.69 0 top
NOREF#336  -  []  235.49 228.7 90 top
NOREF#337  -  []  267.3 226.19 0 top
NOREF#338  -  []  146.88 283.95 0 top
NOREF#339  -  []  229.12 196.43 90 top
NOREF#340  -  []  227.43 218.27 0 top
NOREF#341  -  []  194.39 222.02 90 top
NOREF#342  -  []  258.95 201.55 0 top
NOREF#343  -  []  195.17 276.75 90 top
NOREF#344  -  []  189.84 224.11 90 top
NOREF#345  -  []  189.55 188.99 90 top
NOREF#346  -  []  269.84 224.11 0 top
NOREF#347  -  []  281.75 209.17 0 top
NOREF#348  -  []  261.85 246.47 0 top
NOREF#349  -  []  146.83 196.75 0 top
NOREF#350  -  []  275.58 262.67 90 top
NOREF#351  -  []  263.49 197.85 90 top
NOREF#352  -  []  237.59 175.77 0 top
NOREF#353  -  []  194.07 256.43 90 top
NOREF#354  -  []  236.02 192.78 0 top
NOREF#355  -  []  192.63 172.86 0 top
NOREF#356  -  []  199.4 274.54 0 top
NOREF#357  -  []  239.4 200.64 90 top
NOREF#358  -  []  168.54 260.64 90 top
NOREF#359  -  []  253.62 289.09 90 top
NOREF#360  -  []  184.16 196.43 90 top
NOREF#361  -  []  156.1 271.85 90 top
NOREF#362  -  []  236.8 214.65 90 top
NOREF#363  -  []  237.37 191.6 90 top
NOREF#364  -  []  195.96 168.6 90 top
NOREF#365  -  []  284.64 181.15 90 top
NOREF#366  -  []  186.96 191.6 90 top
NOREF#367  -  []  211.65 293.3 90 top
NOREF#368  -  []  166.32 266.13 0 top
NOREF#369  -  []  239.4 213.09 90 top
NOREF#370  -  []  233.27 253.35 0 top
NOREF#371  -  []  211.25 184.35 0 top
NOREF#372  -  []  191.95 238.07 0 top
NOREF#373  -  []  185.09 257.49 90 top
NOREF#374  -  []  271.53 173.37 90 top
NOREF#375  -  []  190.97 255.7 90 top
NOREF#376  -  []  228.99 196.75 0 top
NOREF#377  -  []  279.72 223.79 90 top
NOREF#378  -  []  272.25 272.17 0 top
NOREF#379  -  []  208.94 221.73 0 top
NOREF#380  -  []  155.05 218.82 0 top
NOREF#381  -  []  138.56 246.51 0 top
NOREF#382  -  []  146.88 289.79 0 top
NOREF#383  -  []  236.52 216.55 0 top
NOREF#384  -  []  267.77 252.78 0 top
NOREF#385  -  []  154.62 247.68 90 top
NOREF#386  -  []  276.02 241.47 0 top
NOREF#387  -  []  196.7 197.85 90 top
NOREF#388  -  []  274.33 204.33 90 top
NOREF#389  -  []  258.95 264.09 0 top
NOREF#390  -  []  144.71 247.68 90 top
NOREF#391  -  []  138.35 209.04 0 top
NOREF#392  -  []  264.04 185.96 0 top
NOREF#393  -  []  244.64 181.15 90 top
NOREF#394  -  []  246.32 212.22 0 top
NOREF#395  -  []  183.49 247.06 90 top
NOREF#396  -  []  242.2 238.35 0 top
NOREF#397  -  []  168.54 202.09 0 top
NOREF#398  -  []  201.75 266.13 0 top
NOREF#399  -  []  130.92 231.95 90 top
NOREF#400  -  []  208.42 268.62 0 top
NOREF#401  -  []  177.25 236.5 90 top
NOREF#402  -  []  286.32 206.13 0 top
NOREF#403  -  []  242.2 238.35 0 top
NOREF#404  -  []  157.92 236.37 90 top
NOREF#405  -  []  260.83 208.59 90 top
NOREF#406  -  []  152.87 188.11 90 top
NOREF#407  -  []  216.55 194.49 90 top
NOREF#408  -  []  258.35 271.84 0 top
NOREF#409  -  []  248.54 204.45 90 top
NOREF#410  -  []  196.1 211.85 90 top
NOREF#411  -  []  266.96 191.6 90 top
NOREF#412  -  []  106.83 127.87 90 top
NOREF#413  -  []  241.75 269.17 0 top
NOREF#414  -  []  243.97 205.9 0 top
NOREF#415  -  []  237.92 190.01 0 top
NOREF#416  -  []  273.03 232.1 0 top
NOREF#417  -  []  272.72 257.6 0 top
NOREF#418  -  []  232.13 274.25 0 top
NOREF#419  -  []  279.4 208.95 0 top
NOREF#420  -  []  186.28 253.03 90 top
NOREF#421  -  []  152.25 218.02 0 top
NOREF#422  -  []  171.05 245.49 90 top
NOREF#423  -  []  268.99 196.75 0 top
NOREF#424  -  []  249.52 210.32 90 top
NOREF#425  -  []  235.92 190.88 90 top
NOREF#426  -  []  155.17 281.32 0 top
NOREF#427  -  []  191.11 193.35 0 top
NOREF#428  -  []  293.99 17.15 0 top
NOREF#429  -  []  208.54 268.95 0 top
NOREF#430  -  []  192.25 272.17 90 top
NOREF#431  -  []  254.38 204.09 0 top
NOREF#432  -  []  219.73 178.35 0 top
NOREF#433  -  []  191.53 173.37 90 top
NOREF#434  -  []  288.54 260.64 90 top
NOREF#435  -  []  171.05 185.49 90 top
NOREF#436  -  []  236.45 247.71 0 top
NOREF#437  -  []  211.21 294.24 90 top
NOREF#438  -  []  233.56 173.37 90 top
NOREF#439  -  []  235.92 255.7 90 top
NOREF#440  -  []  162.26 236.17 90 top
NOREF#441  -  []  220.83 203.76 90 top
NOREF#442  -  []  239.24 184.35 0 top
NOREF#443  -  []  199.27 268.62 0 top
NOREF#444  -  []  192.13 220.09 0 top
NOREF#445  -  []  212.55 224.49 0 top
NOREF#446  -  []  237.25 240.62 0 top
NOREF#447  -  []  195.17 221.32 90 top
NOREF#448  -  []  214.04 210.63 90 top
NOREF#449  -  []  123.4 236.38 0 top
NOREF#450  -  []  244.95 207.27 90 top
NOREF#451  -  []  227.3 226.19 0 top
NOREF#452  -  []  145.09 257.49 90 top
NOREF#453  -  []  148.19 247.71 0 top
NOREF#454  -  []  201.12 188.11 90 top
NOREF#455  -  []  227.77 197.6 0 top
NOREF#456  -  []  159.4 273.09 90 top
NOREF#457  -  []  148.44 181.72 90 top
NOREF#458  -  []  152.72 247.68 0 top
NOREF#459  -  []  109.55 389.27 90 top
NOREF#460  -  []  265.42 274.72 90 top
NOREF#461  -  []  217.25 176.5 90 top
NOREF#462  -  []  199.27 204.78 90 top
NOREF#463  -  []  222.87 226.99 0 top
NOREF#464  -  []  147.99 178.35 0 top
NOREF#465  -  []  246.32 274.76 0 top
NOREF#466  -  []  190.98 244.35 0 top
NOREF#467  -  []  219.08 265.79 0 top
NOREF#468  -  []  188.32 245.63 90 top
NOREF#469  -  []  284.95 260.42 90 top
NOREF#470  -  []  151.19 228.49 0 top
NOREF#471  -  []  140.95 208.91 90 top
NOREF#472  -  []  288.42 268.62 0 top
NOREF#473  -  []  149.29 285.22 0 top
NOREF#474  -  []  193.76 255.7 90 top
NOREF#475  -  []  220.95 204.09 90 top
NOREF#476  -  []  262.87 226.99 0 top
NOREF#477  -  []  218.35 209.04 0 top
NOREF#478  -  []  95.35 456.29 0 top
NOREF#479  -  []  194.78 236.5 90 top
NOREF#480  -  []  211.05 245.49 90 top
NOREF#481  -  []  153.98 178.07 0 top
NOREF#482  -  []  230.88 168.6 90 top
NOREF#483  -  []  283.97 213.09 90 top
NOREF#484  -  []  271.73 232.54 0 top
NOREF#485  -  []  266.69 297.01 90 top
NOREF#486  -  []  192.51 235.77 0 top
NOREF#487  -  []  163.84 200.97 90 top
NOREF#488  -  []  225.41 213.02 90 top
NOREF#489  -  []  243.84 267.82 90 top
NOREF#490  -  []  196.7 193.03 90 top
NOREF#491  -  []  232.25 218.02 0 top
NOREF#492  -  []  190.56 252.78 0 top
NOREF#493  -  []  264.16 196.43 90 top
NOREF#494  -  []  186.7 297.01 90 top
NOREF#495  -  []  199.27 271.67 0 top
NOREF#496  -  []  156.02 197.6 0 top
NOREF#497  -  []  260.43 224.38 90 top
NOREF#498  -  []  214.09 204.23 90 top
NOREF#499  -  []  203.84 211.67 0 top
NOREF#500  -  []  267.3 220.35 0 top
NOREF#501  -  []  175.02 268.14 90 top
NOREF#502  -  []  249.52 270.32 90 top
NOREF#503  -  []  261.85 232.5 0 top
NOREF#504  -  []  195.56 235.77 0 top
NOREF#505  -  []  256.55 254.49 90 top
NOREF#506  -  []  228.44 253.03 90 top
NOREF#507  -  []  156.1 216.42 90 top
NOREF#508  -  []  294.09 200.42 90 top
NOREF#509  -  []  284.95 210.32 90 top
NOREF#510  -  []  153.6 222.39 0 top
NOREF#511  -  []  169.52 204.23 90 top
NOREF#512  -  []  279.4 210.55 90 top
NOREF#513  -  []  168.42 268.62 0 top
NOREF#514  -  []  261.55 207.14 90 top
NOREF#515  -  []  196.7 181.72 90 top
NOREF#516  -  []  147.43 284.11 0 top
NOREF#517  -  []  230.77 213.37 90 top
NOREF#518  -  []  265.41 286.99 90 top
NOREF#519  -  []  135.15 260.67 90 top
NOREF#520  -  []  159.4 274.54 0 top
NOREF#521  -  []  142.88 226.99 0 top
NOREF#522  -  []  191.19 218.07 0 top
NOREF#523  -  []  236.1 276.42 90 top
NOREF#524  -  []  256.55 194.49 90 top
NOREF#525  -  []  227.05 269.24 0 top
NOREF#526  -  []  133.24 201.55 0 top
NOREF#527  -  []  196.52 281.12 0 top
NOREF#528  -  []  248.54 202.09 0 top
NOREF#529  -  []  277.5 185.31 90 top
NOREF#530  -  []  215.24 201.55 90 top
NOREF#531  -  []  271.91 196.43 90 top
NOREF#532  -  []  94.87 102.74 90 top
NOREF#533  -  []  196.57 245.63 0 top
NOREF#534  -  []  228.44 193.03 90 top
NOREF#535  -  []  236.84 227.33 0 top
NOREF#536  -  []  134.38 264.09 0 top
NOREF#537  -  []  130.02 274.45 0 top
NOREF#538  -  []  129.49 266.31 0 top
NOREF#539  -  []  231.24 193.03 90 top
NOREF#540  -  []  203.97 204.45 90 top
NOREF#541  -  []  174.07 270.89 90 top
NOREF#542  -  []  196.57 242.05 0 top
NOREF#543  -  []  277.37 196.43 90 top
NOREF#544  -  []  147.43 224.11 90 top
NOREF#545  -  []  231.73 172.54 0 top
NOREF#546  -  []  187.8 269.99 0 top
NOREF#547  -  []  153.76 195.7 90 top
NOREF#548  -  []  275.17 281.32 90 top
NOREF#549  -  []  239.27 207.82 90 top
NOREF#550  -  []  197.59 175.77 0 top
NOREF#551  -  []  139.08 208.59 0 top
NOREF#552  -  []  189.84 273.7 90 top
NOREF#553  -  []  209.55 237.49 0 top
NOREF#554  -  []  190.56 197.6 0 top
NOREF#555  -  []  14.6 372.12 0 top
NOREF#556  -  []  223.89 185.24 90 top
NOREF#557  -  []  270.6 233.69 90 top
NOREF#558  -  []  268.35 277.95 90 top
NOREF#559  -  []  235.15 176.17 90 top
NOREF#560  -  []  234.33 267.37 90 top
NOREF#561  -  []  264.26 456.29 90 top
NOREF#562  -  []  163.97 272 0 top
NOREF#563  -  []  203.97 200.64 90 top
NOREF#564  -  []  151.24 197.85 90 top
NOREF#565  -  []  155.17 216.75 0 top
NOREF#566  -  []  231.98 286.59 90 top
NOREF#567  -  []  267.8 209.99 0 top
NOREF#568  -  []  243.97 210.55 90 top
NOREF#569  -  []  197.5 185.31 90 top
NOREF#570  -  []  185.42 274.72 90 top
NOREF#571  -  []  197.47 17.15 90 top
NOREF#572  -  []  280.23 176.17 90 top
NOREF#573  -  []  193.95 256.75 0 top
NOREF#574  -  []  188.78 184.35 0 top
NOREF#575  -  []  151.79 191.93 0 top
NOREF#576  -  []  272.25 218.02 0 top
NOREF#577  -  []  178.35 207.01 0 top
NOREF#578  -  []  197.25 191.93 0 top
NOREF#579  -  []  153.27 193.35 0 top
NOREF#580  -  []  270.48 175.77 0 top
NOREF#581  -  []  198.64 233.37 90 top
NOREF#582  -  []  146.16 193.35 0 top
NOREF#583  -  []  273.94 251.93 0 top
NOREF#584  -  []  167.04 299.09 0 top
NOREF#585  -  []  276.02 252.78 0 top
NOREF#586  -  []  190.77 279.22 90 top
NOREF#587  -  []  219.55 240.49 90 top
NOREF#588  -  []  266.16 258.18 0 top
NOREF#589  -  []  173.24 201.55 0 top
NOREF#590  -  []  130.02 214.45 0 top
NOREF#591  -  []  219.55 234.49 0 top
NOREF#592  -  []  197.71 172.86 0 top
NOREF#593  -  []  193.18 282.26 90 top
NOREF#594  -  []  189.12 256.43 90 top
NOREF#595  -  []  276.45 187.71 0 top
NOREF#596  -  []  196.02 257.6 0 top
NOREF#597  -  []  283.97 200.64 90 top
NOREF#598  -  []  198.91 172.21 90 top
NOREF#599  -  []  245.38 286.23 0 top
NOREF#600  -  []  259.73 238.35 0 top
NOREF#601  -  []  165.38 226.23 0 top
NOREF#602  -  []  277.25 196.75 0 top
NOREF#603  -  []  281.44 244.35 0 top
NOREF#604  -  []  165.04 293.3 90 top
NOREF#605  -  []  248.42 264.78 90 top
NOREF#606  -  []  245.04 293.3 90 top
NOREF#607  -  []  146.83 191.93 0 top
NOREF#608  -  []  125.08 17.15 0 top
NOREF#609  -  []  147.9 205.84 90 top
NOREF#610  -  []  162.26 176.17 90 top
NOREF#611  -  []  202.57 291.95 0 top
NOREF#612  -  []  222.81 192.78 0 top
NOREF#613  -  []  279.4 265.9 0 top
NOREF#614  -  []  127.98 226.38 90 top
NOREF#615  -  []  283.84 200.97 90 top
NOREF#616  -  []  152.72 192.78 0 top
NOREF#617  -  []  142.88 213.02 0 top
NOREF#618  -  []  203.84 267.82 90 top
NOREF#619  -  []  242.44 232.28 0 top
NOREF#620  -  []  176.55 280.49 0 top
NOREF#621  -  []  268.35 283.79 90 top
NOREF#622  -  []  281.75 202.32 0 top
NOREF#623  -  []  232.66 166.36 90 top
NOREF#624  -  []  239.72 219.22 90 top
NOREF#625  -  []  258.95 208.91 0 top
NOREF#626  -  []  163.97 200.64 90 top
NOREF#627  -  []  186.43 236.47 90 top
NOREF#628  -  []  196.02 252.78 0 top
NOREF#629  -  []  196.7 257.85 90 top
NOREF#630  -  []  246.32 206.13 0 top
NOREF#631  -  []  0 382.27 0 top
NOREF#632  -  []  203.84 201.77 0 top
NOREF#633  -  []  254.09 264.23 90 top
NOREF#634  -  []  258.35 204.47 0 top
NOREF#635  -  []  324.88 21.69 90 top
NOREF#636  -  []  260.95 201.55 90 top
NOREF#637  -  []  228.81 250.88 90 top
NOREF#638  -  []  250.02 274.45 0 top
NOREF#639  -  []  227.43 278.27 90 top
NOREF#640  -  []  180.83 263.76 90 top
NOREF#641  -  []  206.32 269.17 0 top
NOREF#642  -  []  253.36 201.22 0 top
NOREF#643  -  []  195.92 195.7 90 top
NOREF#644  -  []  147.8 269.99 0 top
NOREF#645  -  []  155.05 214.25 0 top
NOREF#646  -  []  133.24 261.55 0 top
NOREF#647  -  []  257.29 187.78 0 top
NOREF#648  -  []  232.25 282.59 90 top
NOREF#649  -  []  276.7 181.72 90 top
NOREF#650  -  []  189.84 284.11 0 top
NOREF#651  -  []  187.43 218.27 90 top
NOREF#652  -  []  150.97 195.7 90 top
NOREF#653  -  []  275.17 221.32 90 top
NOREF#654  -  []  181.6 294.14 0 top
NOREF#655  -  []  183.89 185.24 90 top
NOREF#656  -  []  205.38 226.23 0 top
NOREF#657  -  []  265.61 192.78 0 top
NOREF#658  -  []  231.18 239.15 0 top
NOREF#659  -  []  196.84 227.33 0 top
NOREF#660  -  []  143.36 193.35 0 top
NOREF#661  -  []  266.69 237.02 90 top
NOREF#662  -  []  230.97 239.57 90 top
NOREF#663  -  []  267.03 171.4 0 top
NOREF#664  -  []  180.83 265.79 90 top
NOREF#665  -  []  158.89 259.3 0 top
NOREF#666  -  []  157.18 176.17 90 top
NOREF#667  -  []  225 456.29 0 top
NOREF#668  -  []  228.78 288.49 0 top
NOREF#669  -  []  275.17 281.32 0 top
NOREF#670  -  []  193.95 251.93 0 top
NOREF#671  -  []  152.25 272.17 90 top
NOREF#672  -  []  218.95 204.09 0 top
NOREF#673  -  []  146.01 195.7 90 top
NOREF#674  -  []  231.11 258.18 0 top
NOREF#675  -  []  208.54 264.45 90 top
NOREF#676  -  []  281.75 212.22 0 top
NOREF#677  -  []  199.4 202.09 0 top
NOREF#678  -  []  253.24 201.55 0 top
NOREF#679  -  []  156.57 245.63 90 top
NOREF#680  -  []  190.77 273.37 90 top
NOREF#681  -  []  179.72 273.6 90 top
NOREF#682  -  []  216.98 265.11 90 top
NOREF#683  -  []  157.18 236.17 90 top
NOREF#684  -  []  196.33 227.9 90 top
NOREF#685  -  []  208.54 262.09 0 top
NOREF#686  -  []  239.27 274.21 0 top
NOREF#687  -  []  227.8 205.39 90 top
NOREF#688  -  []  189.72 226.19 0 top
NOREF#689  -  []  227.43 224.11 0 top
NOREF#690  -  []  173.45 244.35 0 top
NOREF#691  -  []  132.64 204.47 0 top
NOREF#692  -  []  196.02 197.6 0 top
NOREF#693  -  []  258.35 211.84 0 top
NOREF#694  -  []  193.27 253.35 0 top
NOREF#695  -  []  196.57 185.63 0 top
NOREF#696  -  []  156.7 257.85 90 top
NOREF#697  -  []  274.39 222.02 90 top
NOREF#698  -  []  267.8 265.39 90 top
NOREF#699  -  []  221.59 234.15 0 top
NOREF#700  -  []  132.87 227.4 90 top
NOREF#701  -  []  134.51 263.76 0 top
NOREF#702  -  []  145.42 213.02 90 top
NOREF#703  -  []  213.36 261.22 0 top
NOREF#704  -  []  312.52 396.29 0 top
NOREF#705  -  []  204.64 181.15 90 top
NOREF#706  -  []  199.27 270.87 90 top
NOREF#707  -  []  151.91 251.6 90 top
NOREF#708  -  []  277.59 175.77 0 top
NOREF#709  -  []  264.24 20.69 90 top
NOREF#710  -  []  240.13 456.29 90 top
NOREF#711  -  []  243.84 260.97 90 top
NOREF#712  -  []  141.6 248.12 0 top
NOREF#713  -  []  145.42 273.02 90 top
NOREF#714  -  []  191.46 227 0 top
NOREF#715  -  []  216.83 227.03 0 top
NOREF#716  -  []  154.63 283.79 90 top
NOREF#717  -  []  153.39 193.03 90 top
NOREF#718  -  []  235.17 221.32 90 top
NOREF#719  -  []  156.57 193.35 0 top
NOREF#720  -  []  250.92 291.95 90 top
NOREF#721  -  []  186.16 198.18 0 top
NOREF#722  -  []  193.6 282.39 0 top
NOREF#723  -  []  148.78 184.35 0 top
NOREF#724  -  []  150.77 223.79 90 top
NOREF#725  -  []  179.55 180.49 90 top
NOREF#726  -  []  191.98 226.59 90 top
NOREF#727  -  []  235.17 216.75 0 top
NOREF#728  -  []  181.03 267.69 90 top
NOREF#729  -  []  184.04 251.93 0 top
NOREF#730  -  []  193.27 258.18 0 top
NOREF#731  -  []  266.16 193.35 0 top
NOREF#732  -  []  276.57 258.18 0 top
NOREF#733  -  []  162.85 297.22 0 top
NOREF#734  -  []  239.72 283.79 90 top
NOREF#735  -  []  152.61 456.29 0 top
NOREF#736  -  []  179.73 238.35 0 top
NOREF#737  -  []  140.95 206.12 90 top
NOREF#738  -  []  241.44 244.35 0 top
NOREF#739  -  []  165.38 286.23 0 top
NOREF#740  -  []  191.91 196.43 90 top
NOREF#741  -  []  283.97 264.45 90 top
NOREF#742  -  []  275.05 218.82 0 top
NOREF#743  -  []  147.77 251.31 0 top
NOREF#744  -  []  147.77 236.37 0 top
NOREF#745  -  []  226.7 297.01 90 top
NOREF#746  -  []  182.87 213.02 0 top
NOREF#747  -  []  140.83 201.22 90 top
NOREF#748  -  []  204.95 272.86 90 top
NOREF#749  -  []  281.75 266.13 0 top
NOREF#750  -  []  276.8 274.65 90 top
NOREF#751  -  []  193.39 253.03 90 top
NOREF#752  -  []  237.03 178.07 0 top
NOREF#753  -  []  239.4 267.5 90 top
NOREF#754  -  []  161.75 274.76 0 top
NOREF#755  -  []  239.27 271.67 0 top
NOREF#756  -  []  220.83 261.22 90 top
NOREF#757  -  []  248.54 208.95 0 top
NOREF#758  -  []  279.4 204.45 90 top
NOREF#759  -  []  271.46 167 0 top
NOREF#760  -  []  181.55 209.94 90 top
NOREF#761  -  []  228.78 244.35 0 top
NOREF#762  -  []  196.1 276.42 90 top
NOREF#763  -  []  201.75 272.22 0 top
NOREF#764  -  []  279.22 195.7 90 top
NOREF#765  -  []  281.75 269.17 0 top
NOREF#766  -  []  267.77 257.6 0 top
NOREF#767  -  []  279.27 274.21 0 top
NOREF#768  -  []  152.13 280.09 0 top
NOREF#769  -  []  149.84 213.7 90 top
NOREF#770  -  []  191.24 257.85 90 top
NOREF#771  -  []  236.61 233.37 90 top
NOREF#772  -  []  235.17 281.32 90 top
NOREF#773  -  []  196.8 220.49 90 top
NOREF#774  -  []  223.36 193.35 0 top
NOREF#775  -  []  187.8 264.99 90 top
NOREF#776  -  []  234.39 226.59 90 top
NOREF#777  -  []  273.39 197.85 90 top
NOREF#778  -  []  163.84 268.62 0 top
NOREF#779  -  []  208.54 205.9 0 top
NOREF#780  -  []  279.24 184.35 0 top
NOREF#781  -  []  191.98 220.75 90 top
NOREF#782  -  []  131.65 233.3 90 top
NOREF#783  -  []  277.04 244.35 0 top
NOREF#784  -  []  227.8 265.39 90 top
NOREF#785  -  []  215.02 268.14 90 top
NOREF#786  -  []  271.71 171.3 0 top
NOREF#787  -  []  147.8 265.39 90 top
NOREF#788  -  []  259.08 263.76 0 top
NOREF#789  -  []  153.03 232.1 0 top
NOREF#790  -  []  274.39 276.17 90 top
NOREF#791  -  []  163.84 210.87 90 top
NOREF#792  -  []  158.11 172.1 0 top
NOREF#793  -  []  162.87 16.49 0 top
NOREF#794  -  []  178.97 18.69 90 top
NOREF#795  -  []  114.62 458.49 0 top
NOREF#796  -  []  226.7 283.04 90 top
NOREF#797  -  []  222.81 186.81 0 top
NOREF#798  -  []  244.61 234.24 90 top
NOREF#799  -  []  199.4 265.9 0 top
NOREF#800  -  []  235.05 214.25 0 top
NOREF#801  -  []  161.41 227.9 90 top
NOREF#802  -  []  273.27 253.35 0 top
NOREF#803  -  []  251.65 233.3 90 top
NOREF#804  -  []  268.19 247.71 0 top
NOREF#805  -  []  288.42 207.82 90 top
NOREF#806  -  []  273.83 172.21 90 top
NOREF#807  -  []  139.08 201.22 0 top
NOREF#808  -  []  178.95 204.09 0 top
NOREF#809  -  []  133.4 281.8 90 top
NOREF#810  -  []  153.18 217.69 90 top
NOREF#811  -  []  288.54 204.45 90 top
NOREF#812  -  []  192.72 252.78 0 top
NOREF#813  -  []  186.28 197.85 90 top
NOREF#814  -  []  106.68 148.34 90 top
NOREF#815  -  []  162.44 292.28 0 top
NOREF#816  -  []  263.36 253.35 0 top
NOREF#817  -  []  190.77 219.22 90 top
NOREF#818  -  []  226.16 286.14 90 top
NOREF#819  -  []  259.73 238.35 0 top
NOREF#820  -  []  268.44 253.03 90 top
NOREF#821  -  []  252.64 264.47 0 top
NOREF#822  -  []  221.59 308.11 0 top
NOREF#823  -  []  169.17 231.95 0 top
NOREF#824  -  []  203.84 270.87 90 top
NOREF#825  -  []  244.32 231.95 90 top
NOREF#826  -  []  236.52 285.69 0 top
NOREF#827  -  []  243.92 229.94 0 top
NOREF#828  -  []  210.92 231.95 90 top
NOREF#829  -  []  276.02 181.47 0 top
NOREF#830  -  []  236.38 241.15 90 top
NOREF#831  -  []  199.44 239.15 0 top
NOREF#832  -  []  232.25 222.59 90 top
NOREF#833  -  []  256.63 232.23 0 top
NOREF#834  -  []  148.32 258.18 0 top
NOREF#835  -  []  273.76 250.88 90 top
NOREF#836  -  []  279.24 244.35 0 top
NOREF#837  -  []  151.18 179.15 0 top
NOREF#838  -  []  277.25 256.75 0 top
NOREF#839  -  []  130.52 295.42 90 top
NOREF#840  -  []  250.92 231.95 90 top
NOREF#841  -  []  233.39 197.85 90 top
NOREF#842  -  []  239.4 207.5 90 top
NOREF#843  -  []  230.6 173.69 90 top
NOREF#844  -  []  218.95 266.12 0 top
NOREF#845  -  []  154.78 176.5 90 top
NOREF#846  -  []  129.44 260.67 0 top
NOREF#847  -  []  222.87 213.02 0 top
NOREF#848  -  []  252.55 224.49 0 top
NOREF#849  -  []  238.64 233.37 90 top
NOREF#850  -  []  223.49 187.06 90 top
NOREF#851  -  []  168.42 207.82 90 top
NOREF#852  -  []  186.16 258.18 0 top
NOREF#853  -  []  156.57 245.63 0 top
NOREF#854  -  []  136.55 280.49 0 top
NOREF#855  -  []  243.97 265.9 0 top
NOREF#856  -  []  277.37 240.3 90 top
NOREF#857  -  []  279.4 264.45 90 top
NOREF#858  -  []  227.99 178.35 0 top
NOREF#859  -  []  163.84 201.77 0 top
NOREF#860  -  []  247.98 226.38 90 top
NOREF#861  -  []  206.32 262.32 0 top
NOREF#862  -  []  150.98 184.35 0 top
NOREF#863  -  []  203.84 214.21 0 top
NOREF#864  -  []  231.19 223.92 0 top
NOREF#865  -  []  236.02 181.47 0 top
NOREF#866  -  []  230.15 206.89 90 top
NOREF#867  -  []  239.22 195.7 90 top
NOREF#868  -  []  277.03 238.07 0 top
NOREF#869  -  []  137.29 187.78 0 top
NOREF#870  -  []  196.1 280.99 90 top
NOREF#871  -  []  203.04 236.5 90 top
NOREF#872  -  []  192.25 218.02 90 top
NOREF#873  -  []  288.54 202.09 0 top
NOREF#874  -  []  213.78 207.01 0 top
NOREF#875  -  []  144.04 196.75 0 top
NOREF#876  -  []  138.85 181.15 90 top
NOREF#877  -  []  189.67 250.01 0 top
NOREF#878  -  []  197.04 184.35 0 top
NOREF#879  -  []  250.89 202.32 0 top
NOREF#880  -  []  277.18 176.17 90 top
NOREF#881  -  []  138.95 204.09 0 top
NOREF#882  -  []  273.18 217.69 90 top
NOREF#883  -  []  186.43 296.46 90 top
NOREF#884  -  []  184.04 245.96 0 top
NOREF#885  -  []  279.4 214.54 0 top
NOREF#886  -  []  172.87 287.4 90 top
NOREF#887  -  []  268.99 191.93 0 top
NOREF#888  -  []  151.11 200.17 90 top
NOREF#889  -  []  239.22 255.7 90 top
NOREF#890  -  []  279.4 262.09 0 top
NOREF#891  -  []  100.95 17.15 90 top
NOREF#892  -  []  195.05 283.39 0 top
NOREF#893  -  []  220.95 261.55 90 top
NOREF#894  -  []  153.18 222.26 90 top
NOREF#895  -  []  152.25 272.17 0 top
NOREF#896  -  []  269.84 284.11 90 top
NOREF#897  -  []  239.4 212 0 top
NOREF#898  -  []  279.72 214.65 90 top
NOREF#899  -  []  237.74 226.35 90 top
NOREF#900  -  []  190.97 250.88 90 top
NOREF#901  -  []  226.16 200.17 90 top
NOREF#902  -  []  154.86 454.29 90 top
NOREF#903  -  []  199.72 283.79 90 top
NOREF#904  -  []  159.27 210.87 90 top
NOREF#905  -  []  269.24 185.31 90 top
NOREF#906  -  []  145.09 197.49 90 top
NOREF#907  -  []  283.84 274.21 0 top
NOREF#908  -  []  191.11 260.17 90 top
NOREF#909  -  []  229.84 284.11 0 top
NOREF#910  -  []  227.05 209.24 0 top
NOREF#911  -  []  189.84 279.54 0 top
NOREF#912  -  []  203.97 274.54 0 top
NOREF#913  -  []  188.78 288.49 0 top
NOREF#914  -  []  156.7 197.85 90 top
NOREF#915  -  []  133.45 184.35 0 top
NOREF#916  -  []  127.04 239.09 0 top
NOREF#917  -  []  228.95 206.89 0 top
NOREF#918  -  []  279.22 179.57 90 top
NOREF#919  -  []  134.07 210.89 90 top
NOREF#920  -  []  234.33 264.33 90 top
NOREF#921  -  []  197.37 240.3 90 top
NOREF#922  -  []  186.43 282.49 90 top
NOREF#923  -  []  267.05 209.24 0 top
NOREF#924  -  []  230.56 192.78 0 top
NOREF#925  -  []  276.57 198.18 0 top
NOREF#926  -  []  197.04 244.35 0 top
NOREF#927  -  []  217.29 247.78 0 top
NOREF#928  -  []  204.44 292.28 90 top
NOREF#929  -  []  272.66 166.36 90 top
NOREF#930  -  []  256.55 280.49 0 top
NOREF#931  -  []  178.35 264.47 0 top
NOREF#932  -  []  192.72 197.6 0 top
NOREF#933  -  []  203.97 272 0 top
NOREF#934  -  []  281.75 206.13 0 top
NOREF#935  -  []  259.08 261.22 0 top
NOREF#936  -  []  248.42 200.97 90 top
NOREF#937  -  []  258.85 241.15 90 top
NOREF#938  -  []  214.09 260.42 90 top
NOREF#939  -  []  227.99 178.35 0 top
NOREF#940  -  []  268.32 253.35 0 top
NOREF#941  -  []  131.26 244.35 0 top
NOREF#942  -  []  233.76 190.88 90 top
NOREF#943  -  []  261.55 202.57 90 top
NOREF#944  -  []  243.97 272 0 top
NOREF#945  -  []  227.77 192.78 0 top
NOREF#946  -  []  147.05 269.24 0 top
NOREF#947  -  []  206.32 212.22 0 top
NOREF#948  -  []  202.85 237.22 0 top
NOREF#949  -  []  149.29 276.17 90 top
NOREF#950  -  []  275.92 255.7 90 top
NOREF#951  -  []  150.88 168.6 90 top
NOREF#952  -  []  169.49 220.89 0 top
NOREF#953  -  []  153.18 244.35 0 top
NOREF#954  -  []  156.33 227.9 90 top
NOREF#955  -  []  149.84 273.7 0 top
NOREF#956  -  []  183.49 257.85 90 top
NOREF#957  -  []  230.97 190.88 90 top
NOREF#958  -  []  264.04 251.93 0 top
NOREF#959  -  []  192.72 192.78 0 top
NOREF#960  -  []  169.05 232.28 0 top
NOREF#961  -  []  248.54 205.9 0 top
NOREF#962  -  []  157.5 245.31 90 top
NOREF#963  -  []  249.17 231.95 0 top
NOREF#964  -  []  204.61 234.24 90 top
NOREF#965  -  []  288.39 452.29 90 top
NOREF#966  -  []  139.55 240.49 90 top
NOREF#967  -  []  88.44 106.3 90 top
NOREF#968  -  []  288.42 264.78 90 top
NOREF#969  -  []  203.97 205.9 0 top
NOREF#970  -  []  186.83 256.75 0 top
NOREF#971  -  []  227.8 204.99 90 top
NOREF#972  -  []  211.65 233.3 90 top
NOREF#973  -  []  181.85 232.5 0 top
NOREF#974  -  []  195.05 214.25 0 top
NOREF#975  -  []  106.68 148.34 0 top
NOREF#976  -  []  142.81 192.78 0 top
NOREF#977  -  []  203.1 18.69 90 top
NOREF#978  -  []  236.54 167 0 top
NOREF#979  -  []  283.84 268.62 0 top
NOREF#980  -  []  271.91 256.43 90 top
NOREF#981  -  []  190.6 173.69 0 top
NOREF#982  -  []  232.25 272.17 90 top
NOREF#983  -  []  151.91 256.43 90 top
NOREF#984  -  []  189.84 279.54 90 top
NOREF#985  -  []  229.55 248.99 90 top
NOREF#986  -  []  121.84 235.2 0 top
NOREF#987  -  []  231.79 191.93 0 top
NOREF#988  -  []  255.11 201.22 90 top
NOREF#989  -  []  189.84 273.7 0 top
NOREF#990  -  []  275.05 274.25 0 top
NOREF#991  -  []  276.57 185.63 0 top
NOREF#992  -  []  255.02 208.14 90 top
NOREF#993  -  []  192.25 212.18 0 top
NOREF#994  -  []  161.75 262.32 0 top
NOREF#995  -  []  220.59 244.98 90 top
NOREF#996  -  []  133.95 281.02 90 top
NOREF#997  -  []  192.25 282.59 0 top
NOREF#998  -  []  196.57 245.63 90 top
NOREF#999  -  []  190.97 195.7 90 top
NOREF#1000  -  []  273.6 226.96 0 top
NOREF#1001  -  []  147.43 278.27 0 top
NOREF#1002  -  []  262.03 289.03 90 top
NOREF#1003  -  []  208.42 205.58 0 top
NOREF#1004  -  []  198.11 172.1 0 top
NOREF#1005  -  []  142.81 241.71 0 top
NOREF#1006  -  []  190.88 168.6 90 top
NOREF#1007  -  []  173.64 239.09 0 top
NOREF#1008  -  []  195.05 218.82 0 top
NOREF#1009  -  []  275.58 202.67 90 top
NOREF#1010  -  []  196.57 193.35 0 top
NOREF#1011  -  []  91.03 127.87 0 top
NOREF#1012  -  []  243.84 201.77 0 top
NOREF#1013  -  []  151.71 171.3 0 top
NOREF#1014  -  []  156.52 225.69 0 top
NOREF#1015  -  []  236.8 220.49 90 top
NOREF#1016  -  []  148.78 222.65 0 top
NOREF#1017  -  []  192.51 175.77 0 top
NOREF#1018  -  []  219.08 261.22 0 top
NOREF#1019  -  []  128.46 18.69 0 top
NOREF#1020  -  []  192.11 231.4 0 top
NOREF#1021  -  []  151.91 191.6 90 top
NOREF#1022  -  []  254.07 210.89 90 top
NOREF#1023  -  []  161.75 206.13 0 top
NOREF#1024  -  []  191.85 18.69 0 top
NOREF#1025  -  []  191.24 193.03 90 top
NOREF#1026  -  []  152.66 166.36 90 top
NOREF#1027  -  []  176.83 227.03 0 top
NOREF#1028  -  []  155.05 278.82 0 top
NOREF#1029  -  []  165.38 286.23 0 top
NOREF#1030  -  []  272.72 252.78 0 top
NOREF#1031  -  []  176.55 220.49 0 top
NOREF#1032  -  []  147.43 218.27 0 top
NOREF#1033  -  []  148.24 392.33 90 top
NOREF#1034  -  []  159.4 207.5 90 top
NOREF#1035  -  []  181.6 248.12 0 top
NOREF#1036  -  []  220.83 263.76 90 top
NOREF#1037  -  []  237.37 240.3 90 top
NOREF#1038  -  []  181.6 308.11 0 top
NOREF#1039  -  []  253.78 207.01 0 top
NOREF#1040  -  []  197.59 235.77 0 top
NOREF#1041  -  []  197.47 17.15 0 top
NOREF#1042  -  []  268.19 187.71 0 top
NOREF#1043  -  []  282.26 176.17 90 top
NOREF#1044  -  []  214.43 232.23 0 top
NOREF#1045  -  []  254.09 260.42 90 top
NOREF#1046  -  []  203.97 267.5 90 top
NOREF#1047  -  []  80.49 135.25 0 top
NOREF#1048  -  []  188.35 223.79 90 top
NOREF#1049  -  []  265.61 257.6 0 top
NOREF#1050  -  []  293.99 17.15 90 top
NOREF#1051  -  []  266.01 190.88 90 top
NOREF#1052  -  []  209.55 237.49 90 top
NOREF#1053  -  []  164.95 270.32 90 top
NOREF#1054  -  []  273.26 456.29 0 top
NOREF#1055  -  []  243.84 214.21 0 top
NOREF#1056  -  []  167.98 226.38 90 top
NOREF#1057  -  []  181.6 234.15 0 top
NOREF#1058  -  []  193.6 286.96 0 top
NOREF#1059  -  []  195.05 278.82 0 top
NOREF#1060  -  []  143.36 198.18 0 top
NOREF#1061  -  []  241.12 248.11 90 top
NOREF#1062  -  []  234.78 236.5 90 top
NOREF#1063  -  []  218.35 207.01 0 top
NOREF#1064  -  []  175.24 261.55 90 top
NOREF#1065  -  []  267.77 192.78 0 top
NOREF#1066  -  []  218.35 264.47 0 top
NOREF#1067  -  []  243.97 202.09 0 top
NOREF#1068  -  []  152.13 224.66 0 top
NOREF#1069  -  []  183.36 258.18 0 top
NOREF#1070  -  []  237.03 238.07 0 top
NOREF#1071  -  []  251.65 293.3 90 top
NOREF#1072  -  []  226.43 222.5 90 top
NOREF#1073  -  []  277.74 226.35 90 top
NOREF#1074  -  []  258.95 268.91 0 top
NOREF#1075  -  []  157.25 196.75 0 top
NOREF#1076  -  []  268.32 182.05 0 top
NOREF#1077  -  []  264.16 256.43 90 top
NOREF#1078  -  []  243.84 268.62 0 top
NOREF#1079  -  []  137.28 272.5 90 top
NOREF#1080  -  []  241.12 188.11 90 top
NOREF#1081  -  []  288.54 267.5 90 top
NOREF#1082  -  []  136.5 271.94 0 top
NOREF#1083  -  []  199.27 210.87 90 top
NOREF#1084  -  []  239.4 268.95 0 top
NOREF#1085  -  []  235.92 195.7 90 top
NOREF#1086  -  []  163.97 265.9 0 top
NOREF#1087  -  []  182.81 186.81 0 top
NOREF#1088  -  []  184.16 251.6 90 top
NOREF#1089  -  []  95.35 396.29 0 top
NOREF#1090  -  []  129.49 220.89 0 top
NOREF#1091  -  []  210.89 206.13 0 top
NOREF#1092  -  []  259.08 208.59 0 top
NOREF#1093  -  []  180.95 261.55 90 top
NOREF#1094  -  []  169.17 291.95 0 top
NOREF#1095  -  []  278.13 389.27 90 top
NOREF#1096  -  []  236.8 280.49 90 top
NOREF#1097  -  []  179.08 205.79 0 top
NOREF#1098  -  []  143.49 257.85 90 top
NOREF#1099  -  []  253.64 239.09 0 top
NOREF#1100  -  []  139.72 273.6 90 top
NOREF#1101  -  []  157.25 180.62 0 top
NOREF#1102  -  []  150.77 213.37 90 top
NOREF#1103  -  []  153.18 211.85 90 top
NOREF#1104  -  []  136.38 204.09 90 top
